# Altium PCB Copy of PCB1.PcbDoc (part 1 of 4)
Units mm, origin at the board's own origin, x right, y up, seen from the top; angles counter-clockwise.
Board outline 200 x 135 mm, 2 copper layers (Top Layer, Bottom Layer); 350 components, 150 nets, 843 pads, 244 vias.
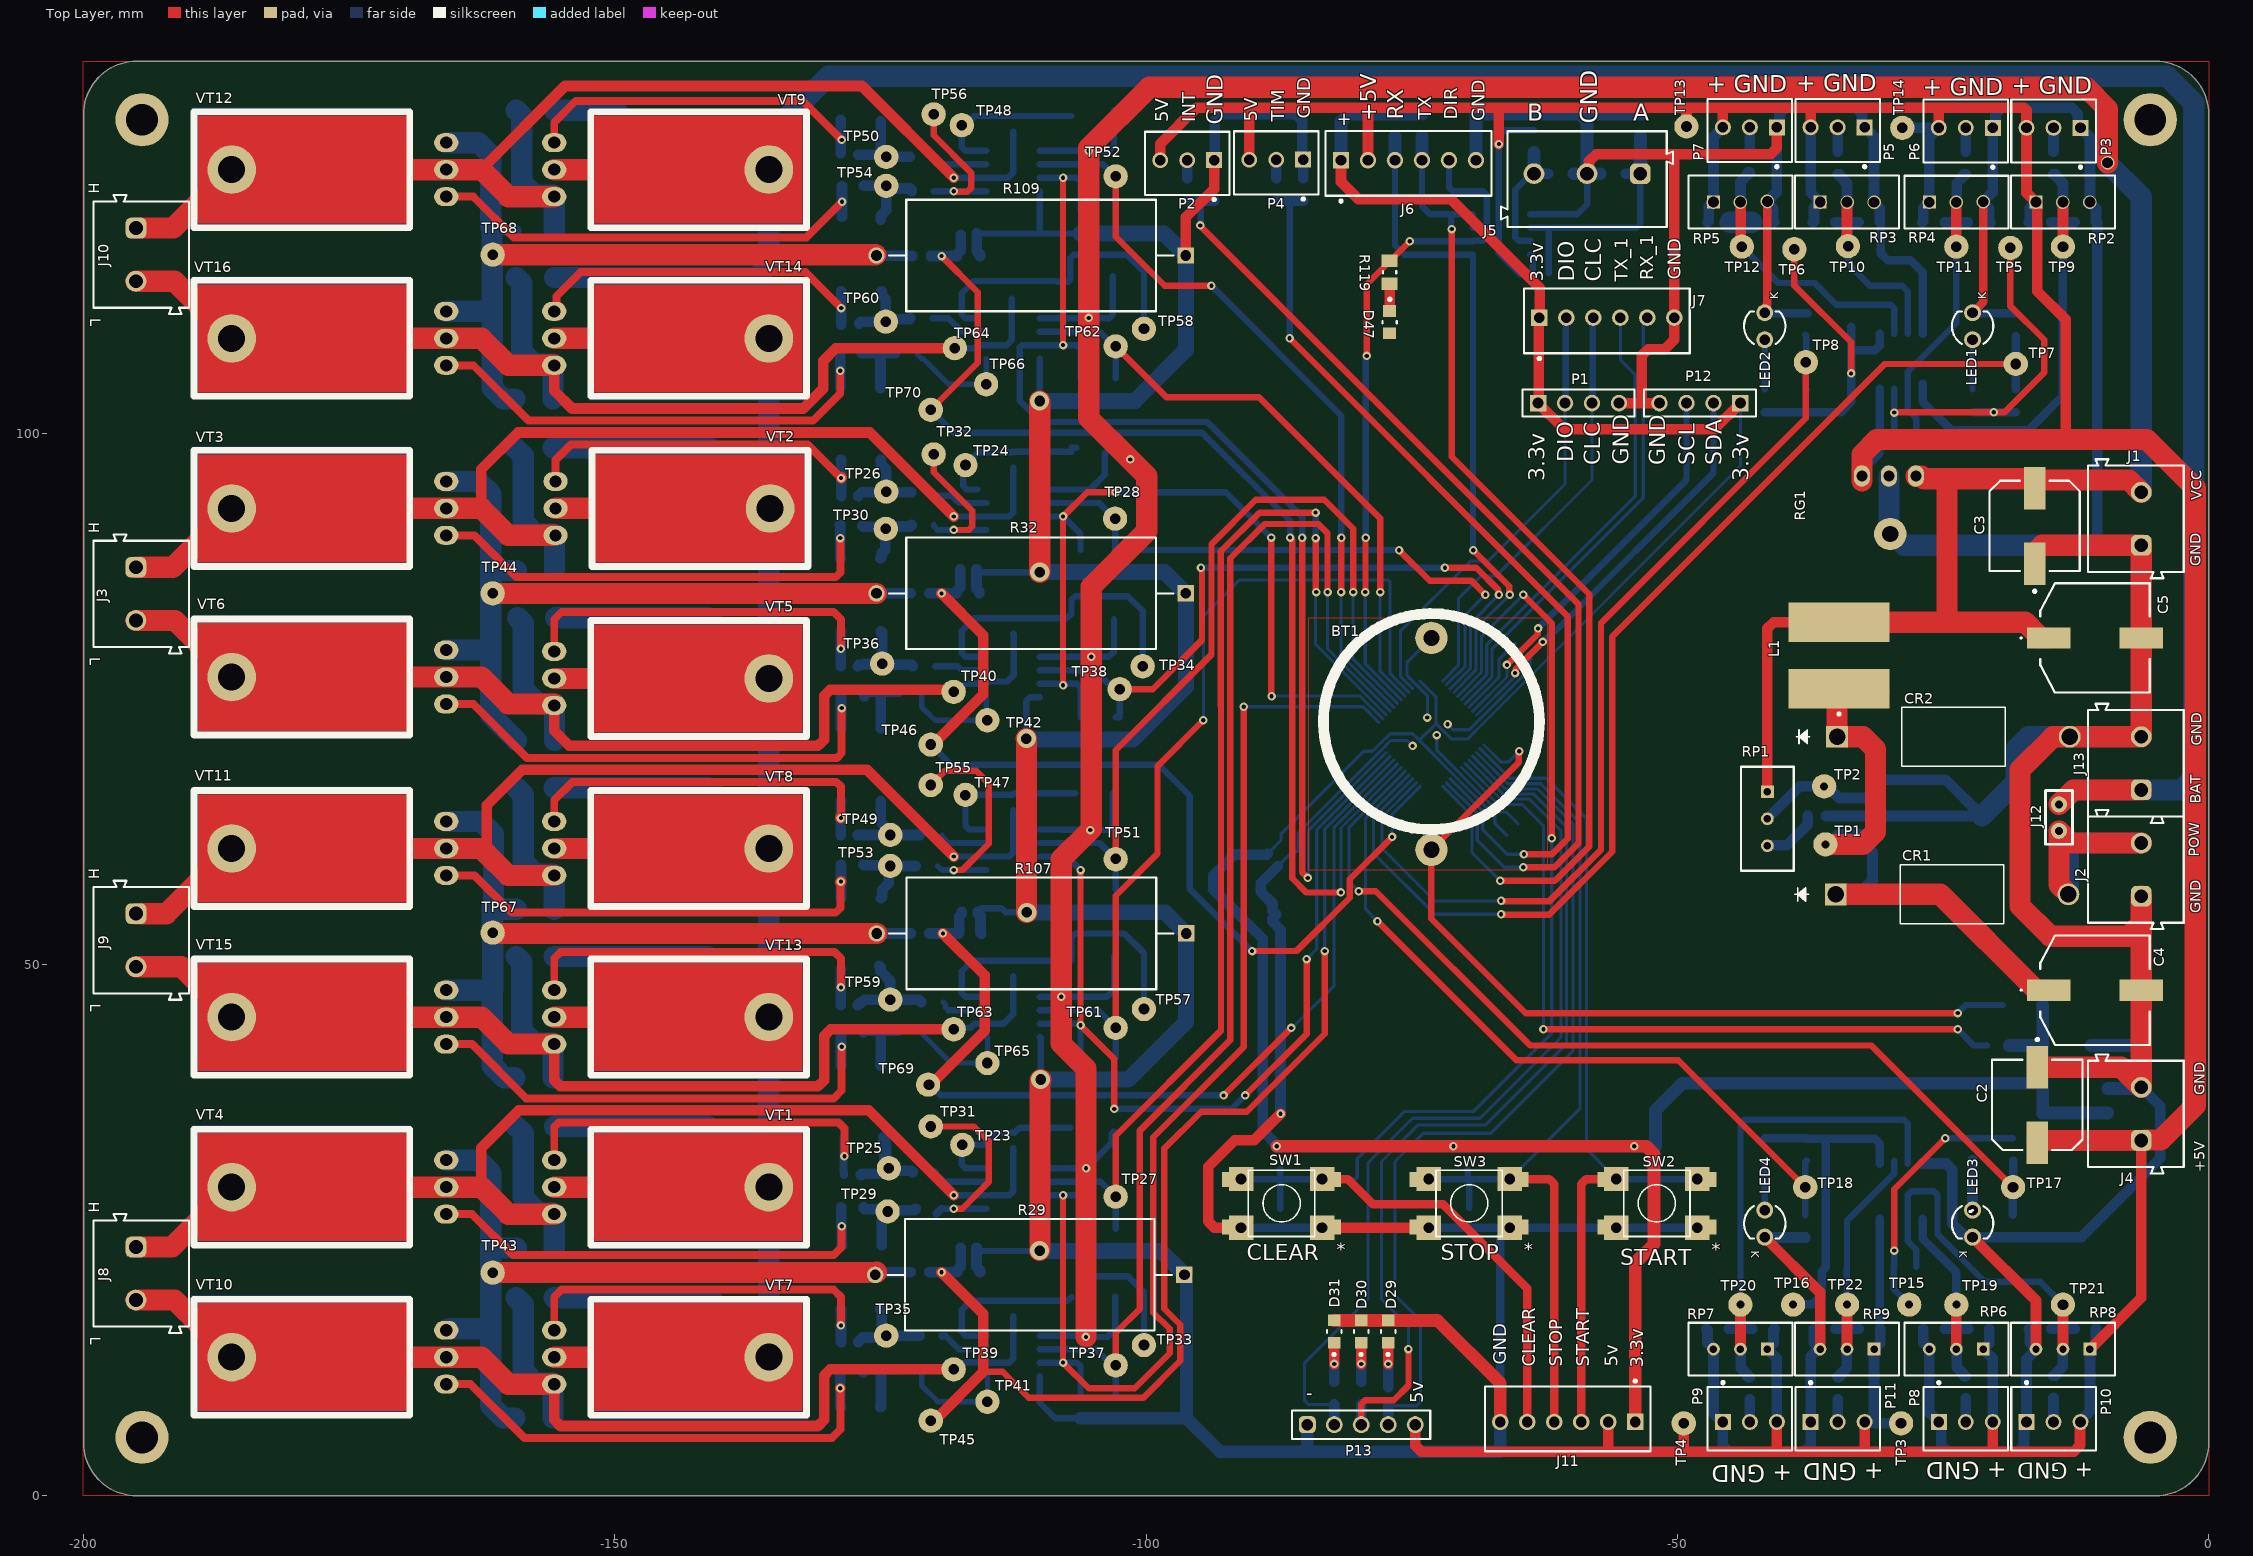
[diagram p0: Top Layer view]
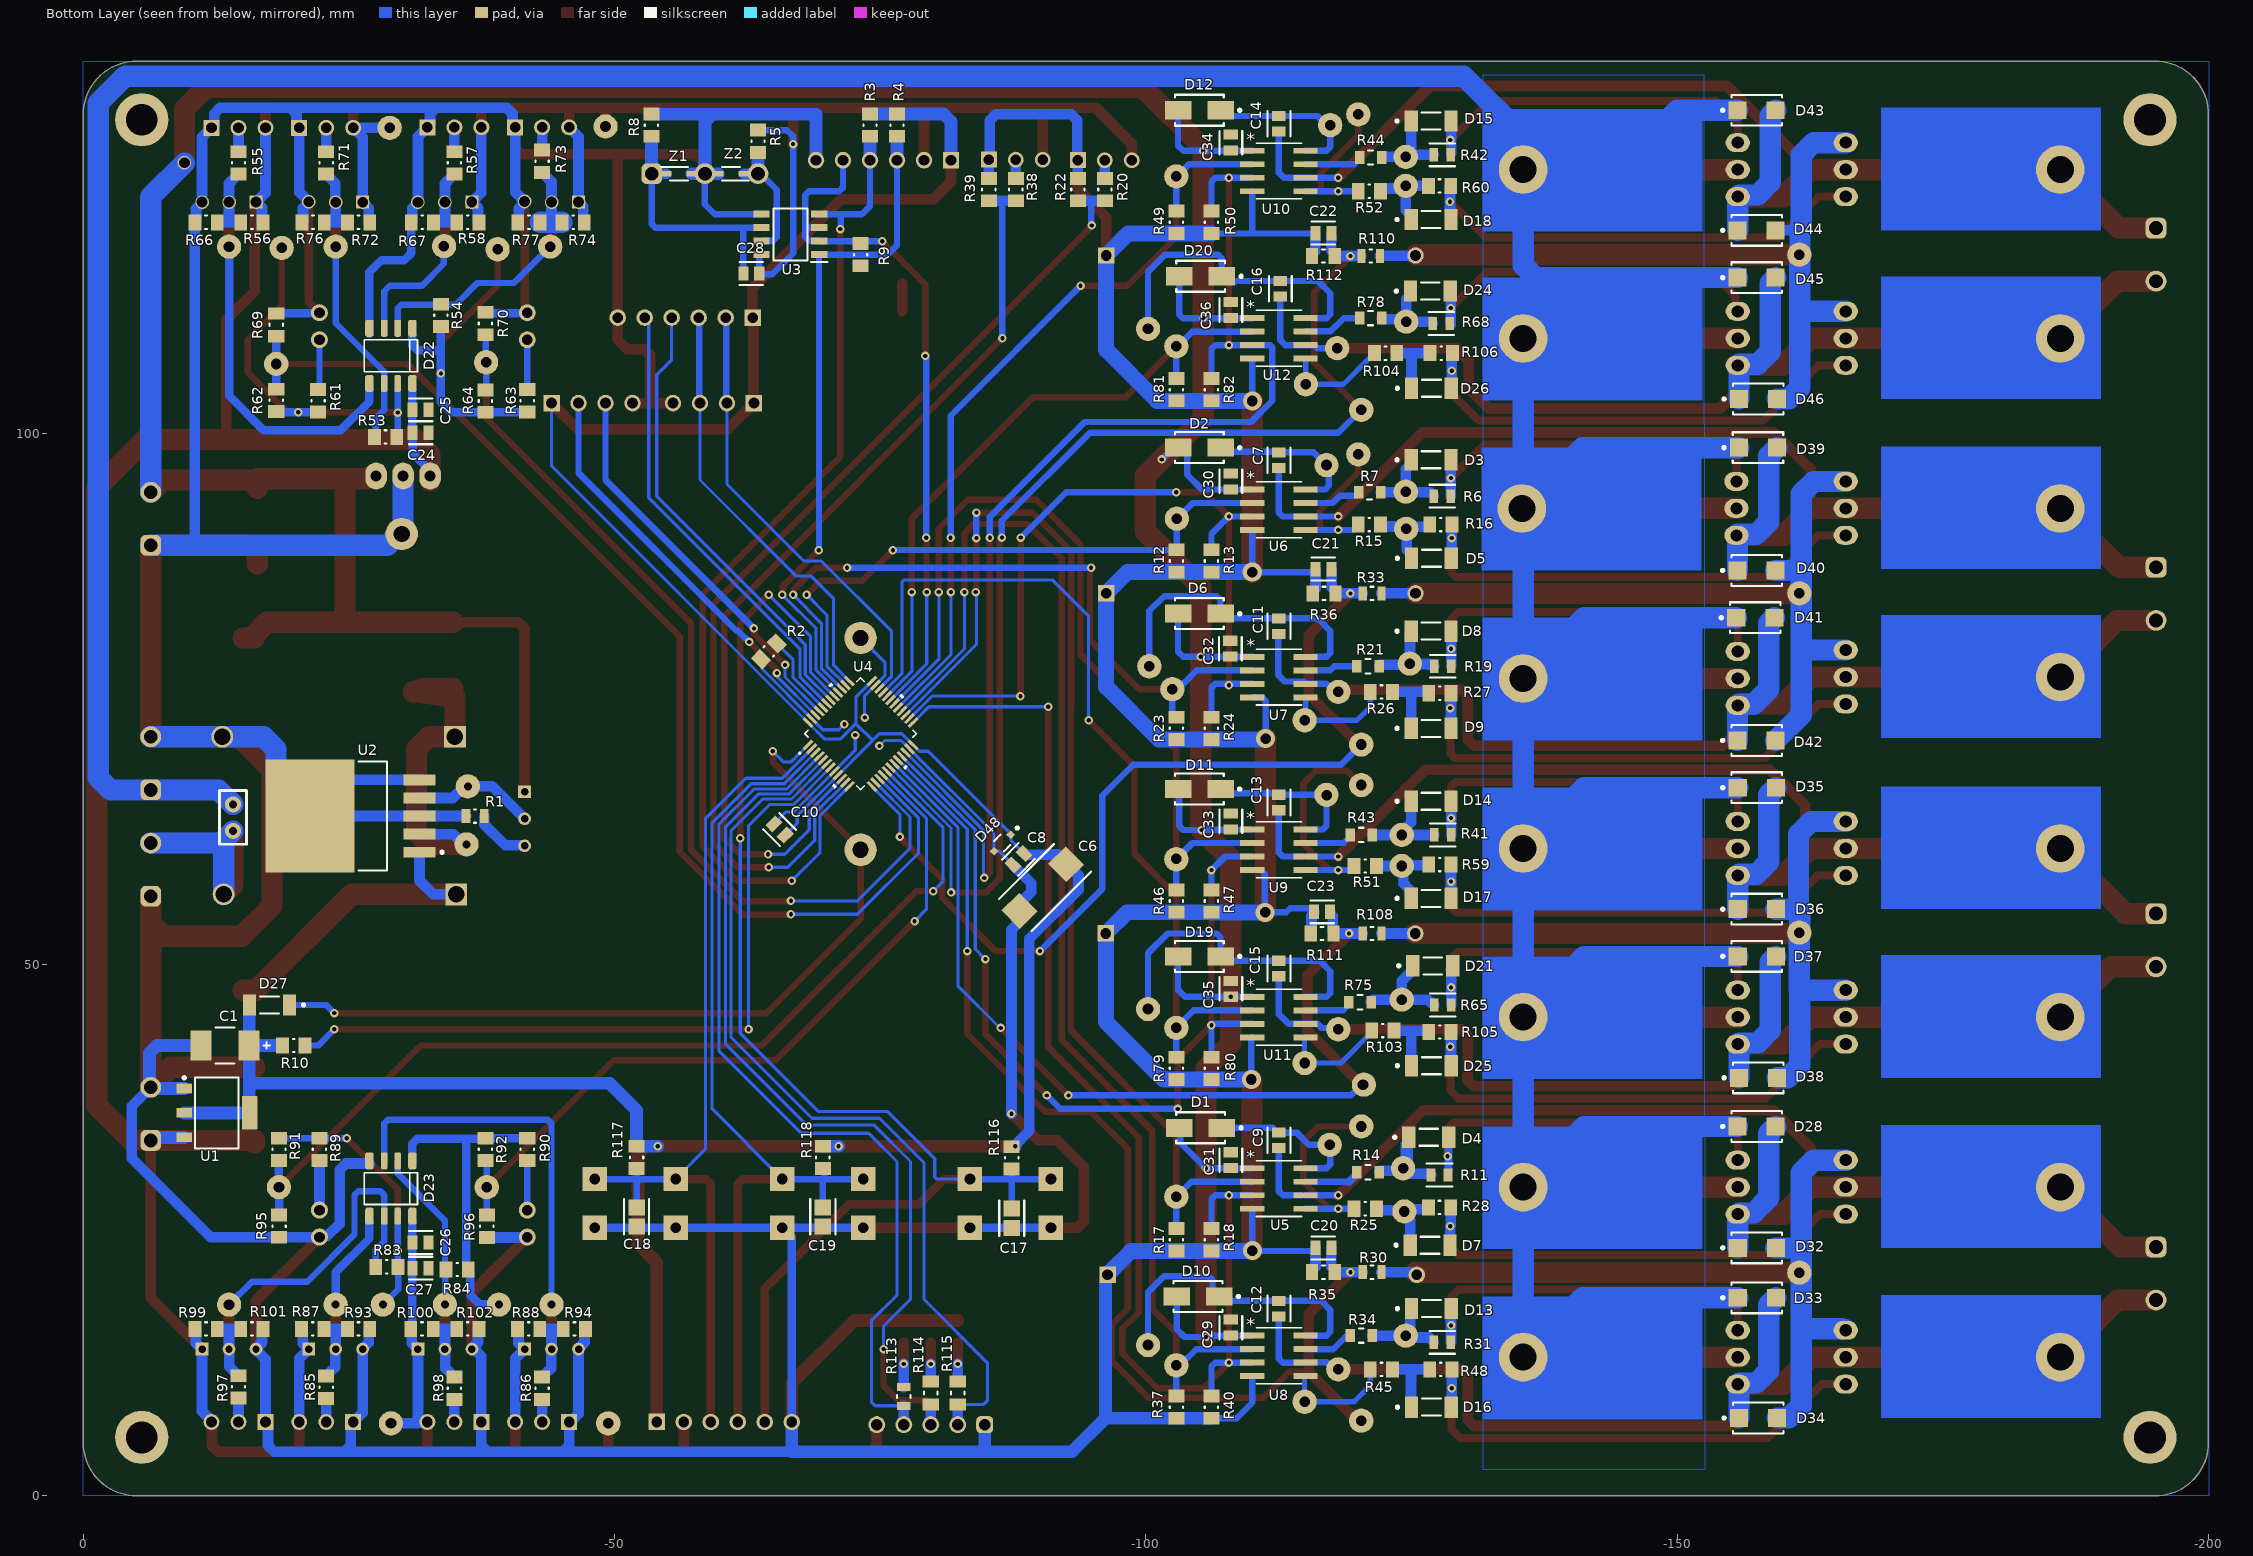
[diagram p1: Bottom Layer view, seen from below]

## Layer stack, top to bottom
Top Solder: solder mask 0.0102, Solder Resist, Dk 3.5
Top Layer: signal copper 0.0356
Dielectric 1: dielectric 0.32, FR-4, Dk 4.8
Bottom Layer: signal copper 0.0356
Bottom Solder: solder mask 0.0102, Solder Resist, Dk 3.5

## Board outline
-200,5 -200,130 cw(c-195,130) -195,135 -4.973,135 cw(c-5,130) 0,130 0,5 cw(c-5,5) -5,0 -4.975,0 -195,0 cw(c-195,5)

## Design rules (kind name [scope] priority, off if disabled: settings)
Clearance [All] p1: gap=0.1 ignorepadtopadclearanceinfootprint=TRUE
ComponentClearance [All] p1: gap=-2.254 collisioncheckmode=3 verticalgap=0.254 showdistances=FALSE
DiffPairsRouting [All] p1: maxlimit=0.254 minlimit=0.1 mostfreqgap=0.254 toplayer_minwidth=0.3 toplayer_maxwidth=2 toplayer_prefwidth=0.3 bottomlayer_minwidth=0.3 bottomlayer_maxwidth=2 bottomlayer_prefwidth=0.3 maxuncoupledlength=12.7
HoleToHoleClearance [All] p1: gap=0.2 allowstackedmicrovias=TRUE
LayerPairs [All] p1 off: enforce=TRUE
MinimumSolderMaskSliver [All] p1: minsoldermaskwidth=0.05
PasteMaskExpansion [All] p1: expansion=0.5
PlaneClearance [All] p1: clearance=0.2
PlaneConnect [All] p1: planeconnectstyle=Direct reliefexpansion=0.508 reliefentries=4 reliefconductorwidth=0.254 reliefairgap=0.254
PolygonConnect [All] p1: connectstyle=Direct reliefconductorwidth=0.254 reliefentries=4 polygonreliefangle="90 Angle" airgapwidth=0.254
RoutingVias [All] p1: holewidth=0.4 width=0.8 viastyle="Through Hole" minholewidth=0.254 minwidth=0.5 maxholewidth=0.75 maxwidth=1.5
ShortCircuit [All] p1: allowed=TRUE
SilkToSilkClearance [All] p1 off: silktosilkclearance=0.05
SolderMaskExpansion [All] p1: expansion=0.2 istentingtop=FALSE
UnRoutedNet [All] p1: checkbadconnections=TRUE
Width [All] p1: maxlimit=3 minlimit=0.254 preferedwidth=2
19 further rules are at their usual default settings.

## Components (designator, comment, footprint, x,y, rotation, side; value= is the part's Value field where it differs from the comment)
BT1 "CR2032_BAT" CR2032_BAT -73.152,72.858 r270 top locked
C1 "TAJC476M016RNJ" FP-TAJC-MFG -13.335,42.378 r180 bottom
C2 "EEE-1HA101UP" FP-SF-MFG -16.129,36.784 r270 top value=100uF
C3 "EEE-1HA101UP" FP-SF-MFG -16.383,91.273 r90 top value=100uF
C4 "EEE1HA101AP" EEEFK1V331P -10.7,47.585 r270 top
C5 "EEE1HA101AP" EEEFK1V331P -10.7,80.732 r270 top
C6 "293D106X9050E2TE3" CAPPM7343X430N -90.297,57.237 r315 bottom
C7 "GRM21BR61C106KE15L" FP-GRM21B-0_1-IPC_C -112.522,97.461 r270 bottom
C8 "C0805C224K5RACTU" FP-C0805C-DN-MFG -88.011,59.904 r315 bottom value="0.22 μF"
C9 "GRM21BR61C106KE15L" FP-GRM21B-0_1-IPC_C -112.522,33.453 r270 bottom
C10 "C0805C224K5RACTU" FP-C0805C-DN-MFG -65.532,62.698 r45 bottom value="0.22 μF"
C11 "GRM21BR61C106KE15L" FP-GRM21B-0_1-IPC_C -112.522,81.84 r270 bottom
C12 "GRM21BR61C106KE15L" FP-GRM21B-0_1-IPC_C -112.522,17.613 r270 bottom
C13 "GRM21BR61C106KE15L" FP-GRM21B-0_1-IPC_C -112.522,65.238 r270 bottom
C14 "GRM21BR61C106KE15L" FP-GRM21B-0_1-IPC_C -112.522,129.119 r270 bottom
C15 "GRM21BR61C106KE15L" FP-GRM21B-0_1-IPC_C -112.522,49.617 r270 bottom
C16 "GRM21BR61C106KE15L" FP-GRM21B-0_1-IPC_C -112.649,113.59 r270 bottom
C17 "C0805C224K5RACTU" FP-C0805C-DN-IPC_A -87.376,26.122 r90 bottom value="0.22 μF"
C18 "C0805C224K5RACTU" FP-C0805C-DN-IPC_A -52.07,26.249 r90 bottom value="0.22 μF"
C19 "C0805C224K5RACTU" FP-C0805C-DN-IPC_A -69.596,26.249 r90 bottom value="0.22 μF"
C20 "C0805C224K5RACTU" FP-C0805C-DN-MFG -116.713,23.328 r0 bottom value="0.22 μF"
C21 "C0805C224K5RACTU" FP-C0805C-DN-MFG -116.713,87.209 r0 bottom value="0.22 μF"
C22 "C0805C224K5RACTU" FP-C0805C-DN-MFG -116.713,118.832 r0 bottom value="0.22 μF"
C23 "C0805C224K5RACTU" FP-C0805C-DN-MFG -116.586,54.951 r0 bottom value="0.22 μF"
C24 "C0805C224K5RACTU" FP-C0805C-DN-MFG -31.75,100.036 r180 bottom value="0.22 μF"
C25 "C0805C224K5RACTU" FP-C0805C-DN-MFG -31.75,102.195 r180 bottom value="0.22 μF"
C26 "C0805C224K5RACTU" FP-C0805C-DN-MFG -31.75,23.836 r180 bottom value="0.22 μF"
C27 "C0805C224K5RACTU" FP-C0805C-DN-MFG -31.75,21.423 r180 bottom value="0.22 μF"
C28 "C0805C224K5RACTU" FP-C0805C-DN-MFG -62.865,115.022 r0 bottom value="0.22 μF"
C29 "C0805C224K5RACTU" FP-C0805C-DN-MFG -108,15.835 r90 bottom value="0.22 μF"
C30 "C0805C224K5RACTU" FP-C0805C-DN-MFG -108,95.464 r90 bottom value="0.22 μF"
C31 "C0805C224K5RACTU" FP-C0805C-DN-MFG -108,31.583 r90 bottom value="0.22 μF"
C32 "C0805C224K5RACTU" FP-C0805C-DN-MFG -107.95,79.716 r90 bottom value="0.22 μF"
C33 "C0805C224K5RACTU" FP-C0805C-DN-MFG -108,63.46 r90 bottom value="0.22 μF"
C34 "C0805C224K5RACTU" FP-C0805C-DN-MFG -108,127.341 r90 bottom value="0.22 μF"
C35 "C0805C224K5RACTU" FP-C0805C-DN-MFG -108,47.712 r90 bottom value="0.22 μF"
C36 "C0805C224K5RACTU" FP-C0805C-DN-MFG -108,111.593 r90 bottom value="0.22 μF"
CR1 "1N5822RL" DO-201AD_STM -35.103,56.602 r0 top
CR2 "1N5822RL" DO-201AD_STM -34.975,71.432 r0 top
D1 "US1G-13-F" FP-SMA-MFG -105.156,34.631 r0 bottom value=20pF
D2 "US1G-13-F" FP-SMA-MFG -105.029,98.639 r0 bottom value=20pF
D3 "LL4448-GS08" FP-6_560-5005_01-4-MFG -126.843,97.496 r180 bottom value=4pF
D4 "LL4448-GS08" FP-6_560-5005_01-4-MFG -126.619,33.742 r180 bottom value=4pF
D5 "LL4448-GS08" FP-6_560-5005_01-4-MFG -126.873,88.225 r180 bottom value=4pF
D6 "US1G-13-F" FP-SMA-MFG -105.029,83.018 r0 bottom value=20pF
D7 "LL4448-GS08" FP-6_560-5005_01-4-MFG -126.746,23.582 r180 bottom value=4pF
D8 "LL4448-GS08" FP-6_560-5005_01-4-MFG -126.843,81.367 r180 bottom value=4pF
D9 "LL4448-GS08" FP-6_560-5005_01-4-MFG -126.843,72.223 r180 bottom value=4pF
D10 "US1G-13-F" FP-SMA-MFG -104.902,18.756 r0 bottom value=20pF
D11 "US1G-13-F" FP-SMA-MFG -105.029,66.508 r0 bottom value=20pF
D12 "US1G-13-F" FP-SMA-MFG -105.029,130.389 r0 bottom value=20pF
D13 "LL4448-GS08" FP-6_560-5005_01-4-MFG -126.873,17.613 r180 bottom value=4pF
D14 "LL4448-GS08" FP-6_560-5005_01-4-MFG -126.843,65.365 r180 bottom value=4pF
D15 "LL4448-GS08" FP-6_560-5005_01-4-MFG -126.843,129.373 r180 bottom value=4pF
D16 "LL4448-GS08" FP-6_560-5005_01-4-MFG -126.873,8.342 r180 bottom value=4pF
D17 "LL4448-GS08" FP-6_560-5005_01-4-MFG -126.843,56.221 r180 bottom value=4pF
D18 "LL4448-GS08" FP-6_560-5005_01-4-MFG -126.843,120.102 r180 bottom value=4pF
D19 "US1G-13-F" FP-SMA-MFG -105.029,50.76 r0 bottom value=20pF
D20 "US1G-13-F" FP-SMA-MFG -105.156,114.768 r0 bottom value=20pF
D21 "LL4448-GS08" FP-6_560-5005_01-4-MFG -127,49.871 r180 bottom value=4pF
D22 "LMV358AIDR" 8-SOIC -28.956,107.275 r270 bottom
D23 "LMV358AIDR" 8-SOIC -28.956,28.916 r270 bottom
D24 "LL4448-GS08" FP-6_560-5005_01-4-MFG -126.776,113.371 r180 bottom value=4pF
D25 "LL4448-GS08" FP-6_560-5005_01-4-MFG -126.873,40.473 r180 bottom value=4pF
D26 "LL4448-GS08" FP-6_560-5005_01-4-MFG -126.873,104.227 r180 bottom value=4pF
D27 "LL4448-GS08" FP-6_560-5005_01-4-MFG -17.526,46.188 r0 bottom value=4pF
D28 "GF1M-E3/5CA" FP-GF1M-E3-5CA-MFG -157.48,34.758 r180 bottom
D29 "151031YS06000" Wurth_Electronics_0_MFG -77.216,15.454 r90 top
D30 "151031YS06000" LED_GREEN -79.756,15.454 r90 top
D31 "151031YS06000" LED_BLUE -82.296,15.454 r90 top
D32 "GF1M-E3/5CA" FP-GF1M-E3-5CA-MFG -157.492,23.328 r180 bottom
D33 "GF1M-E3/5CA" FP-GF1M-E3-5CA-MFG -157.492,18.629 r180 bottom
D34 "GF1M-E3/5CA" FP-GF1M-E3-5CA-MFG -157.619,7.326 r180 bottom
D35 "GF1M-E3/5CA" FP-GF1M-E3-5CA-MFG -157.492,66.635 r180 bottom
D36 "GF1M-E3/5CA" FP-GF1M-E3-5CA-MFG -157.492,55.205 r180 bottom
D37 "GF1M-E3/5CA" FP-GF1M-E3-5CA-MFG -157.492,50.76 r180 bottom
D38 "GF1M-E3/5CA" FP-GF1M-E3-5CA-MFG -157.619,39.33 r180 bottom
D39 "GF1M-E3/5CA" FP-GF1M-E3-5CA-MFG -157.607,98.639 r180 bottom
D40 "GF1M-E3/5CA" FP-GF1M-E3-5CA-MFG -157.48,87.082 r180 bottom
D41 "GF1M-E3/5CA" FP-GF1M-E3-5CA-MFG -157.353,82.637 r180 bottom
D42 "GF1M-E3/5CA" FP-GF1M-E3-5CA-MFG -157.48,71.08 r180 bottom
D43 "GF1M-E3/5CA" FP-GF1M-E3-5CA-MFG -157.48,130.389 r180 bottom
D44 "GF1M-E3/5CA" FP-GF1M-E3-5CA-MFG -157.48,119.086 r180 bottom
D45 "GF1M-E3/5CA" FP-GF1M-E3-5CA-MFG -157.48,114.641 r180 bottom
D46 "GF1M-E3/5CA" FP-GF1M-E3-5CA-MFG -157.619,103.211 r180 bottom
D47 "151031YS06000" LED_BLUE -77.089,110.45 r270 top
D48 "BZX384-C5V1,115" FP-SOD323-MFG -86.487,61.428 r315 bottom
J1 "691101710002" 691101710002 -6.85,91.948 r90 top
J2 "691101710002" 691101710002 -6.85,58.928 r90 top
J3 "691101710002" 691101710002 -194.572,84.883 r270 top
J4 "691101710002" 691101710002 -6.85,35.941 r90 top
J5 "691101710003" 691101710003 -58.5,123.92 r180 top
J6 "SWR25X-NRTC-S06-ST-BA" Sullins_SWR25X-NRTC-S06-ST-BA_MFG -75.311,125.39 r0 top
J7 "SWR25X-NRTC-S06-ST-BA" Sullins_SWR25X-NRTC-S06-ST-BA_MFG -56.642,110.577 r0 top
J8 "691101710002" 691101710002 -194.564,20.915 r270 top
J9 "691101710002" 691101710002 -194.564,52.284 r270 top
J10 "691101710002" 691101710002 -194.564,116.8 r270 top
J11 "SWR25X-NRTC-S06-ST-BA" Sullins_SWR25X-NRTC-S06-ST-BA_MFG -60.325,7.245 r180 top
J12 "Jumper 1x2.54" Jumper_2.54 -14.097,62.571 r90 top
J13 "691101710002" 691101710002 -6.85,68.932 r90 top
L1 "22µH, 2.04A" WE-PD2_1054 -34.798,79.081 r90 top
LED1 "151033BS03000" "Type 3mm" -22.225,110.069 r90 top
LED2 "151033BS03000" "Type 3mm" -41.783,110.064 r90 top
LED3 "151033BS03000" "Type 3mm" -22.225,25.614 r270 top
LED4 "151033BS03000" "Type 3mm" -41.783,25.614 r270 top
P1 "TSW-104-08-G-S" SMTC-TSW-104-08-X-S -63.119,102.83 r0 top
P2 "61900311121" 61900311121 -96.139,125.39 r0 top
P3 "61900311121" 61900311121 -14.605,128.438 r0 top
P4 "61900311121" 61900311121 -87.757,125.436 r0 top
P5 "61900311121" 61900311121 -34.925,128.484 r0 top
P6 "61900311121" 61900311121 -22.86,128.438 r0 top
P7 "61900311121" 61900311121 -43.18,128.484 r0 top
P8 "61900311121" 61900311121 -22.86,7.245 r180 top
P9 "61900311121" 61900311121 -43.18,7.245 r180 top
P10 "61900311121" 61900311121 -14.605,7.245 r180 top
P11 "61900311121" 61900311121 -34.925,7.245 r180 top
P12 "TSW-104-08-G-S" SMTC-TSW-104-08-X-S -44.069,102.83 r180 top
P13 "61300511121" 61300511121 -79.756,6.691 r0 top
R1 "1K" Vishay_CRCW0805-e3_IPC_C -36.868,63.968 r180 bottom
R2 "10K" Vishay_CRCW0805-e3_IPC_A -64.516,79.462 r315 bottom
R3 "10K" Vishay_CRCW0805-e3_IPC_A -74.041,128.992 r90 bottom
R4 "10K" Vishay_CRCW0805-e3_IPC_A -76.581,128.992 r90 bottom
R5 "10K" Vishay_CRCW0805-e3_IPC_A -63.5,127.468 r90 bottom
R6 "RT0805FRE0710RL" FP-RT0805-IPC_C -127.889,94.067 r180 bottom value=10Ω
R7 "RT0805FRE0710RL" FP-RT0805-MFG -121.065,94.448 r180 bottom value=10Ω
R8 "10K" Vishay_CRCW0805-e3_IPC_A -53.467,128.992 r270 bottom
R9 "10K" Vishay_CRCW0805-e3_IPC_A -73.152,116.8 r90 bottom
R10 "10K" Vishay_CRCW0805-e3_IPC_A -19.812,42.378 r0 bottom
R11 "RT0805FRE0710RL" FP-RT0805-IPC_C -127.635,30.186 r180 bottom value=10Ω
R12 "10k" Vishay_CRCW0805-e3_IPC_A -102.87,87.971 r90 bottom
R13 "CRCW080510K0FKEA" FP-CRCW0805-e3-IPC_A -106.172,87.971 r90 bottom
R14 "RT0805FRE0710RL" FP-RT0805-MFG -120.904,30.44 r180 bottom value=10Ω
R15 "10" Vishay_CRCW0805-e3_IPC_A -121.031,91.4 r0 bottom
R16 "10" Vishay_CRCW0805-e3_IPC_A -127.762,91.4 r0 bottom
R17 "10k" Vishay_CRCW0805-e3_IPC_A -102.87,24.09 r90 bottom
R18 "CRCW080510K0FKEA" FP-CRCW0805-e3-IPC_A -106.172,24.09 r90 bottom
R19 "RT0805FRE0710RL" FP-RT0805-IPC_C -127.929,78.065 r180 bottom value=10Ω
R20 "33K" Vishay_CRCW0805-e3_IPC_A -96.139,122.931 r90 bottom
R21 "RT0805FRE0710RL" FP-RT0805-MFG -120.904,78.065 r180 bottom value=10Ω
R22 "33K" Vishay_CRCW0805-e3_IPC_A -93.599,122.931 r90 bottom
R23 "10k" Vishay_CRCW0805-e3_IPC_A -102.87,72.223 r90 bottom
R24 "CRCW080510K0FKEA" FP-CRCW0805-e3-IPC_A -106.172,72.223 r90 bottom
R25 "10" Vishay_CRCW0805-e3_IPC_A -120.65,27.011 r0 bottom
R26 "10" Vishay_CRCW0805-e3_IPC_A -122.174,75.652 r0 bottom
R27 "10" Vishay_CRCW0805-e3_IPC_A -127.67,75.525 r0 bottom
R28 "10" Vishay_CRCW0805-e3_IPC_A -127.635,27.138 r0 bottom
R29 "SQP500JB-R91" FP-SQP500-MFG -110.948,20.788 r180 top value=1.2Ω
R30 "10K" Yageo_RC0805_IPC_C -121.285,21.042 r180 bottom
R31 "RT0805FRE0710RL" FP-RT0805-IPC_C -127.889,14.438 r180 bottom value=10Ω
R32 "SQP500JB-R91" FP-SQP500-MFG -110.821,84.923 r180 top value=1.2Ω
R33 "10K" Yageo_RC0805_IPC_C -121.285,84.923 r180 bottom
R34 "RT0805FRE0710RL" FP-RT0805-MFG -120.269,15.073 r180 bottom value=10Ω
R35 "1K" Yageo_RC0805_IPC_A -116.713,21.042 r180 bottom
R36 "1K" Yageo_RC0805_IPC_A -116.773,84.923 r180 bottom
R37 "10k" Vishay_CRCW0805-e3_IPC_A -102.87,8.342 r90 bottom
R38 "33K" Vishay_CRCW0805-e3_IPC_A -87.757,122.931 r90 bottom
R39 "10K" Vishay_CRCW0805-e3_IPC_A -85.217,122.931 r90 bottom
R40 "CRCW080510K0FKEA" FP-CRCW0805-e3-IPC_A -106.172,8.342 r90 bottom
R41 "RT0805FRE0710RL" FP-RT0805-IPC_C -127.929,62.19 r180 bottom value=10Ω
R42 "RT0805FRE0710RL" FP-RT0805-IPC_C -127.889,126.198 r180 bottom value=10Ω
R43 "RT0805FRE0710RL" FP-RT0805-MFG -120.269,62.19 r180 bottom value=10Ω
R44 "RT0805FRE0710RL" FP-RT0805-MFG -121.158,125.944 r180 bottom value=10Ω
R45 "10" Vishay_CRCW0805-e3_IPC_A -122.174,11.898 r0 bottom
R46 "10k" Vishay_CRCW0805-e3_IPC_A -102.87,55.967 r90 bottom
R47 "CRCW080510K0FKEA" FP-CRCW0805-e3-IPC_A -106.172,55.967 r90 bottom
R48 "10" Vishay_CRCW0805-e3_IPC_A -127.762,11.898 r0 bottom
R49 "10k" Vishay_CRCW0805-e3_IPC_A -102.87,119.848 r90 bottom
R50 "CRCW080510K0FKEA" FP-CRCW0805-e3-IPC_A -106.172,119.848 r90 bottom
R51 "10" Vishay_CRCW0805-e3_IPC_A -120.65,59.269 r0 bottom
R52 "10" Vishay_CRCW0805-e3_IPC_A -121.031,122.769 r0 bottom
R53 "100k" Vishay_CRCW0805-e3_IPC_A -28.448,99.655 r180 bottom
R54 "100k" Vishay_CRCW0805-e3_IPC_A -33.655,111.085 r270 bottom
R55 "47k" Vishay_CRCW0805-e3_IPC_A -14.605,125.436 r270 bottom
R56 "47k" Vishay_CRCW0805-e3_IPC_A -15.875,119.848 r180 bottom
R57 "47k" FP-CRCW0805-e3-IPC_A -34.925,125.436 r270 bottom
R58 "47k" Vishay_CRCW0805-e3_IPC_A -36.195,119.848 r180 bottom
R59 "10" Vishay_CRCW0805-e3_IPC_A -127.67,59.396 r0 bottom
R60 "10" Vishay_CRCW0805-e3_IPC_A -127.635,123.277 r0 bottom
R61 "220" Vishay_CRCW0805-e3_IPC_A -22.098,103.049 r270 bottom
R62 "10K" Vishay_CRCW0805-e3_IPC_A -18.161,103.084 r270 bottom
R63 "220" Vishay_CRCW0805-e3_IPC_A -41.783,103.049 r270 bottom
R64 "10K" Vishay_CRCW0805-e3_IPC_A -37.846,103.027 r270 bottom
R65 "RT0805FRE0710RL" FP-RT0805-IPC_C -127.929,46.188 r180 bottom value=10Ω
R66 "47k" Vishay_CRCW0805-e3_IPC_A -11.557,119.848 r180 bottom
R67 "47k" Vishay_CRCW0805-e3_IPC_A -31.912,119.848 r180 bottom
R68 "RT0805FRE0710RL" FP-RT0805-IPC_C -127.802,110.323 r180 bottom value=10Ω
R69 "2.2K" Yageo_RC0805_IPC_A -18.161,110.196 r270 bottom
R70 "2.2K" Vishay_CRCW0805-e3_IPC_A -37.846,110.323 r270 bottom
R71 "47k" Vishay_CRCW0805-e3_IPC_A -22.86,125.436 r270 bottom
R72 "47k" Vishay_CRCW0805-e3_IPC_A -25.908,119.848 r180 bottom
R73 "47k" Vishay_CRCW0805-e3_IPC_A -43.18,125.598 r270 bottom
R74 "47k" Vishay_CRCW0805-e3_IPC_A -46.101,119.848 r180 bottom
R75 "RT0805FRE0710RL" FP-RT0805-MFG -120.142,46.442 r180 bottom value=10Ω
R76 "47k" Vishay_CRCW0805-e3_IPC_A -21.625,119.848 r0 bottom
R77 "47k" Vishay_CRCW0805-e3_IPC_A -41.945,119.848 r0 bottom
R78 "RT0805FRE0710RL" FP-RT0805-MFG -121.158,110.831 r180 bottom value=10Ω
R79 "10k" Vishay_CRCW0805-e3_IPC_A -102.87,40.219 r90 bottom
R80 "CRCW080510K0FKEA" FP-CRCW0805-e3-IPC_A -106.172,40.219 r90 bottom
R81 "10k" Vishay_CRCW0805-e3_IPC_A -102.87,104.1 r90 bottom
R82 "CRCW080510K0FKEA" FP-CRCW0805-e3-IPC_A -106.172,104.1 r90 bottom
R83 "100k" Vishay_CRCW0805-e3_IPC_A -28.575,21.55 r180 bottom
R84 "100k" Vishay_CRCW0805-e3_IPC_A -35.179,21.296 r180 bottom
R85 "47k" Vishay_CRCW0805-e3_IPC_A -22.86,10.212 r90 bottom
R86 "47k" Vishay_CRCW0805-e3_IPC_A -43.18,10.12 r90 bottom
R87 "47k" Vishay_CRCW0805-e3_IPC_A -21.59,15.708 r0 bottom
R88 "47k" FP-CRCW0805-e3-IPC_A -41.91,15.708 r0 bottom
R89 "220" Vishay_CRCW0805-e3_IPC_A -22.225,32.599 r90 bottom
R90 "220" Vishay_CRCW0805-e3_IPC_A -41.783,32.599 r90 bottom
R91 "10K" Vishay_CRCW0805-e3_IPC_A -18.415,32.599 r90 bottom
R92 "10K" Vishay_CRCW0805-e3_IPC_A -37.846,32.599 r90 bottom
R93 "47k" Vishay_CRCW0805-e3_IPC_A -25.908,15.708 r0 bottom
R94 "47k" Vishay_CRCW0805-e3_IPC_A -46.228,15.708 r0 bottom
R95 "2.2K" Vishay_CRCW0805-e3_IPC_A -18.432,25.377 r90 bottom
R96 "2.2K" Vishay_CRCW0805-e3_IPC_A -37.973,25.36 r90 bottom
R97 "47k" Vishay_CRCW0805-e3_IPC_A -14.605,10.247 r90 bottom
R98 "CRCW080510K0FKEA" FP-CRCW0805-e3-IPC_A -34.925,10.12 r90 bottom
R99 "47k" Vishay_CRCW0805-e3_IPC_A -11.557,15.708 r0 bottom
R100 "47k" Vishay_CRCW0805-e3_IPC_A -31.877,15.708 r0 bottom
R101 "47k" Vishay_CRCW0805-e3_IPC_A -15.875,15.708 r180 bottom
R102 "47k" Vishay_CRCW0805-e3_IPC_A -36.195,15.708 r180 bottom
R103 "10" Vishay_CRCW0805-e3_IPC_A -122.301,43.775 r0 bottom
R104 "10" Vishay_CRCW0805-e3_IPC_A -122.555,107.529 r0 bottom
R105 "10" Vishay_CRCW0805-e3_IPC_A -127.67,43.648 r0 bottom
R106 "10" Vishay_CRCW0805-e3_IPC_A -127.797,107.529 r0 bottom
R107 "SQP500JB-R91" FP-SQP500-MFG -110.794,52.919 r180 top value=1.2Ω
R108 "10K" Yageo_RC0805_IPC_C -121.285,52.919 r180 bottom
R109 "SQP500JB-R91" FP-SQP500-MFG -110.821,116.723 r180 top value=1.2Ω
R110 "10K" Yageo_RC0805_IPC_C -121.158,116.673 r180 bottom
R111 "1K" Yageo_RC0805_IPC_A -116.586,52.919 r180 bottom
R112 "1K" Yageo_RC0805_IPC_A -116.713,116.673 r180 bottom
R113 "220" Yageo_RC0805_IPC_C -77.216,9.345 r270 bottom
R114 "220" Yageo_RC0805_IPC_A -79.756,9.672 r270 bottom
R115 "220" Yageo_RC0805_IPC_A -82.296,9.672 r270 bottom
R116 "10K" FP-CRCW0805-e3-IPC_A -87.376,31.802 r90 bottom
R117 "10K" FP-CRCW0805-e3-IPC_A -52.07,31.837 r90 bottom
R118 "10K" FP-CRCW0805-e3-IPC_A -69.596,31.837 r90 bottom
R119 "220" Yageo_RC0805_IPC_A -77.089,115.149 r90 top
RG1 "Reg_Fairchild_LM7805CT_eec" TO-220(bend_rad) -29.718,85.812 r180 top
RP1 "50k" Bourns_3296W_MFG -41.529,63.714 r180 top
RP2 "10k" Bourns_3296W_MFG -13.716,121.758 r270 top
RP3 "10k" Bourns_3296W_MFG -34.036,121.758 r270 top
RP4 "10k" Bourns_3296W_MFG -23.749,121.753 r270 top
RP5 "10k" Bourns_3296W_MFG -44.069,121.758 r270 top
RP6 "10k" Bourns_3296W_MFG -23.749,13.798 r90 top
RP7 "10k" Bourns_3296W_MFG -44.069,13.798 r90 top
RP8 "10k" Bourns_3296W_MFG -13.716,13.798 r90 top
RP9 "10k" Bourns_3296W_MFG -34.036,13.798 r90 top
SW1 "4-1437565-2" SW4_FSM-5P23_TEC -87.249,27.519 r180 top
SW2 "4-1437565-2" SW4_FSM-5P23_TEC -51.943,27.519 r180 top
SW3 "4-1437565-2" SW4_FSM-5P23_TEC -69.596,27.519 r180 top
TP1 "Test_Point_PCB" Test_Point#1 -36.068,61.301 r180 top
TP2 "Test_Point_PCB" Test_Point#1 -36.195,66.762 r180 top
TP3 "Test_Point_PCB" Test_Point#1 -28.956,6.818 r0 top
TP4 "Test_Point_PCB" Test_Point#1 -49.403,6.818 r0 top
TP5 "Test_Point_PCB" Test_Point#1 -18.669,117.435 r0 top
TP6 "Test_Point_PCB" Test_Point#1 -38.989,117.308 r0 top
TP7 "Test_Point_PCB" Test_Point#1 -18.161,106.513 r0 top
TP8 "Test_Point_PCB" Test_Point#1 -37.91,106.675 r90 top
TP9 "Test_Point_PCB" Test_Point#2 -13.716,117.562 r0 top
TP10 "Test_Point_PCB" Test_Point#1 -33.953,117.606 r90 top
TP11 "Test_Point_PCB" Test_Point#1 -23.749,117.562 r90 top
TP12 "Test_Point_PCB" Test_Point#1 -43.942,117.562 r90 top
TP13 "Test_Point_PCB" Test_Point#1 -49.149,128.865 r90 top
TP14 "Test_Point_PCB" Test_Point#1 -28.829,128.738 r90 top
TP15 "Test_Point_PCB" Test_Point#1 -28.194,17.994 r90 top
TP16 "Test_Point_PCB" Test_Point#1 -39.116,17.994 r90 top
TP17 "Test_Point_PCB" Test_Point#1 -18.415,29.043 r180 top
TP18 "Test_Point_PCB" Test_Point#1 -37.973,29.043 r90 top
TP19 "Test_Point_PCB" Test_Point#1 -23.749,17.994 r90 top
TP20 "Test_Point_PCB" Test_Point#1 -44.069,17.994 r90 top
TP21 "Test_Point_PCB" Test_Point#1 -13.716,17.994 r90 top
TP22 "Test_Point_PCB" Test_Point#1 -34.036,17.994 r90 top
TP23 "Test_Point_PCB" Test_Point#1 -117.3,33.025 r0 top
TP24 "Test_Point_PCB" Test_Point#3 -117.348,97.115 r0 top
TP25 "Test_Point_PCB" Test_Point#1 -124.206,30.821 r90 top
TP26 "Test_Point_PCB" Test_Point#4 -124.46,94.448 r90 top
TP27 "Test_Point_PCB" Test_Point#1 -102.87,28.154 r90 top
TP28 "Test_Point_PCB" Test_Point#5 -103.793,91.991 r90 top
TP29 "Test_Point_PCB" Test_Point#1 -124.333,26.757 r90 top
TP30 "Test_Point_PCB" Test_Point#6 -124.418,91.291 r90 top
TP31 "Test_Point_PCB" Test_Point#1 -120.269,34.758 r90 top
TP32 "Test_Point_PCB" Test_Point#7 -120.269,98.385 r90 top
TP33 "Test_Point_PCB" Test_Point#1 -100.203,14.184 r0 top
TP34 "Test_Point_PCB" Test_Point#1 -100.33,78.065 r0 top
TP35 "Test_Point_PCB" Test_Point#1 -124.46,15.073 r90 top
TP36 "Test_Point_PCB" Test_Point#1 -124.841,78.319 r270 top
TP37 "Test_Point_PCB" Test_Point#1 -102.87,12.279 r90 top
TP38 "Test_Point_PCB" Test_Point#1 -102.489,75.906 r90 top
TP39 "Test_Point_PCB" Test_Point#1 -118.11,11.898 r90 top
TP40 "Test_Point_PCB" Test_Point#1 -118.11,75.652 r90 top
TP41 "Test_Point_PCB" Test_Point#1 -114.935,8.85 r90 top
TP42 "Test_Point_PCB" Test_Point#1 -114.935,72.985 r270 top
TP43 "Test_Point_PCB" Test_Point#8 -161.544,21.042 r90 top
TP44 "Test_Point_PCB" Test_Point#9 -161.544,84.923 r90 top
TP45 "Test_Point_PCB" Test_Point#1 -120.269,7.072 r90 top
TP46 "Test_Point_PCB" Test_Point#1 -120.269,70.699 r90 top
TP47 "Test_Point_PCB" Test_Point#1 -116.997,65.965 r90 top
TP48 "Test_Point_PCB" Test_Point#10 -117.348,128.992 r90 top
TP49 "Test_Point_PCB" Test_Point#1 -124.079,62.19 r180 top
TP50 "Test_Point_PCB" Test_Point#11 -124.46,126.325 r90 top
TP51 "Test_Point_PCB" Test_Point#1 -102.87,59.904 r90 top
TP52 "Test_Point_PCB" Test_Point#1 -102.87,124.166 r90 top
TP53 "Test_Point_PCB" Test_Point#1 -124.079,59.269 r90 top
TP54 "Test_Point_PCB" Test_Point#1 -124.46,123.277 r90 top
TP55 "Test_Point_PCB" Test_Point#1 -120.269,66.889 r90 top
TP56 "Test_Point_PCB" Test_Point#12 -120.269,130.008 r90 top
TP57 "Test_Point_PCB" Test_Point#1 -100.203,45.807 r90 top
TP58 "Test_Point_PCB" Test_Point#1 -100.203,109.815 r0 top
TP59 "Test_Point_PCB" Test_Point#1 -124.079,46.696 r90 top
TP60 "Test_Point_PCB" Test_Point#13 -124.587,110.831 r90 top
TP61 "Test_Point_PCB" Test_Point#1 -102.87,44.029 r90 top
TP62 "Test_Point_PCB" Test_Point#1 -102.87,108.164 r90 top
TP63 "Test_Point_PCB" Test_Point#1 -118.11,43.902 r90 top
TP64 "Test_Point_PCB" Test_Point#14 -118.364,107.656 r90 top
TP65 "Test_Point_PCB" Test_Point#1 -114.935,40.727 r0 top
TP66 "Test_Point_PCB" Test_Point#1 -115.062,104.608 r90 top
TP67 "Test_Point_PCB" Test_Point#15 -161.544,52.919 r90 top
TP68 "Test_Point_PCB" Test_Point#9 -161.544,116.8 r90 top
TP69 "Test_Point_PCB" Test_Point#1 -120.523,38.695 r90 top
TP70 "Test_Point_PCB" Test_Point#1 -120.269,102.195 r90 top
U1 "LM1117MPX-3.3/NOPB" DCY0004A_L -12.573,36.028 r180 bottom
U2 "LM2576" ON_Semiconductor_936A-02_MFG -25.156,63.968 r90 bottom
U3 "MAX485ECSA+" SOIC127P600X175-8N -66.548,118.705 r0 bottom
U4 "STM32F303CCT6" LQFP48-7x7mm -73.152,71.715 r135 bottom locked
U5 "IR2104SPBF" SOIC8_INF-M -112.522,28.916 r180 bottom
U6 "IR2104SPBF" SOIC8_INF-M -112.522,92.797 r180 bottom
U7 "IR2104SPBF" SOIC8_INF-M -112.522,77.049 r180 bottom
U8 "IR2104SPBF" SOIC8_INF-M -112.522,13.168 r180 bottom
U9 "IR2104SPBF" SOIC8_INF-M -112.522,60.793 r180 bottom
U10 "IR2104SPBF" SOIC8_INF-M -112.522,124.674 r180 bottom
U11 "IR2104SPBF" SOIC8_INF-M -112.522,45.045 r180 bottom
U12 "IR2104SPBF" SOIC8_INF-M -112.522,108.926 r180 bottom
VT1 "IRF3205" TO-220(bend2) -144.526,29.297 r270 top
VT2 "IRF3205" TO-220(bend2) -144.399,93.178 r270 top
VT3 "IRF3205" TO-220(bend2) -177.038,92.67 r90 top
VT4 "IRF3205" TO-220(bend2) -177.038,28.789 r90 top
VT5 "IRF3205" TO-220(bend2) -144.526,77.176 r270 top
VT6 "IRF3205" TO-220(bend2) -177.038,76.795 r90 top
VT7 "IRF3205" TO-220(bend2) -144.526,13.295 r270 top
VT8 "IRF3205" TO-220(bend2) -144.526,61.174 r270 top
VT9 "IRF3205" TO-220(bend2) -144.526,125.055 r270 top
VT10 "IRF3205" TO-220(bend2) -177.038,12.787 r90 top
VT11 "IRF3205" TO-220(bend2) -177.038,60.666 r90 top
VT12 "IRF3205" TO-220(bend2) -177.038,124.547 r90 top
VT13 "IRF3205" TO-220(bend2) -144.526,45.299 r270 top
VT14 "IRF3205" TO-220(bend2) -144.526,109.18 r270 top
VT15 "IRF3205" TO-220(bend2) -177.038,44.791 r90 top
VT16 "IRF3205" TO-220(bend2) -177.038,108.672 r90 top
Z1 "MM3Z5V1ST1G" SOD2512X110N -56.064,124.42 r180 bottom
Z2 "MM3Z5V1ST1G" SOD2512X110N -60.96,124.42 r0 bottom

## Footprints (in the part's own frame and the unit in brackets; to place one, negate y for a bottom-side part, rotate by r counter-clockwise, add the part's x,y. Pads: shape width x height; smd on the part's side, far side on the other; paste and mask are expansions set on the pad)
8-SOIC [mm] "SOIC, 8-Leads, Body 4,90x3,90mm, Pitch 1,27mm, IPC Medium Density"
  rrect50% 1.6x0.8 smd: 1(-2.6,2.025) 4(-2.6,-2.025) 5(2.6,-2.025) 8(2.6,2.025)
  rrect50% 1.6x0.6 smd: 2(-2.6,0.635) 3(-2.6,-0.635) 6(2.6,-0.635) 7(2.6,0.635)
  silkscreen extent -1.5,-2.5 1.5,2.5, body extent -3,-2.45 3,2.45, height 1.75
61300511121 [mm] "Pin Header, pitch 2.54 mm, THT, Vertical, single row, 5p"
  rrect50% 1.6x1.6 hole 1.1: 1(-5.08,0)
  round 1.6 hole 1.1: 2(-2.54,0) 3(0,0) 4(2.54,0) 5(5.08,0)
  silkscreen extent -6.5,-1.35 6.5,1.35, body extent -6.35,-1.27 6.35,1.27, height 8.57
61900311121 [mm] "2.54mm Male Locking Header, 3p"
  rect 1.5x1.5 hole 1: 1(2.54,0.3)
  round 1.5 hole 1: 2(0,0.3) 3(-2.54,0.3)
  silkscreen extent -3.98,-3.52 3.98,2.98, body extent -3.81,-2.9 3.81,2.9, height 11.53
691101710002 [mm] "5,00mm - modular - blue - Horizontal entry with pressure clamp - 12,6mm height - 02p"
  rrect50% 1.95x1.95 hole 1.3: 1(-2.5,-0.5)
  round 1.95 hole 1.3: 2(2.5,-0.5)
  silkscreen extent -5.6,-4.5 5.6,4.5, body extent -5.6,-4.5 5.6,4.5, height 12.65
691101710003 [mm] "5,00mm - modular - blue - Horizontal entry with pressure clamp - 12,6mm height - 03p"
  rrect50% 1.95x1.95 hole 1.3: 1(-5,-0.5)
  round 1.95 hole 1.3: 2(0,-0.5) 3(5,-0.5)
  silkscreen extent -8.1,-4.5 8.1,4.5, body extent -8.1,-4.5 8.1,4.5, height 12.65
Bourns_3296W_MFG [mm]
  rect 1.2x1.2 hole 0.7 paste-1000 mask+0: 1(0.005,-2.54)
  round 1.2 hole 0.7 paste-1000 mask+0: 2(0.005,0) 3(0.005,2.54)
  silkscreen extent -2.48,-4.89 2.48,4.89, body extent -2.58,-4.99 2.58,4.99, height 0.25
CAPPM7343X430N [mm]
  rect 2.35x2.45 smd: 1(-3.1,0) 2(3.1,0)
  silkscreen extent -4.27,-2.15 3.65,2.15, body extent -3.59,-2.35 3.6,2.35, height 4.12
CR2032_BAT [mil]
  round 120 hole 60: 1(-310,0) 2(475,0)
  silkscreen extent -400,-400 400,400, body extent -432,-435 525,439, height 350
DCY0004A_L [mm] "SOT223, 4-Leads, Body 6.7x3.7mm, Pitch 2.3mm, IPC High Density"
  rrect11% 1.45x0.9 smd: 1(-3.075,2.3) 2(-3.075,0) 3(-3.075,-2.3)
  rrect7% 1.45x3.15 smd: 4(3.075,0)
  silkscreen extent -3.2,-3.35 2.05,3.42, body extent -3.5,-3.25 3.5,3.25, height 1.62
DO-201AD_STM [mil]
  rect 81x81 hole 61 mask+0: 1(0,0)
  round 81 hole 61 mask+0: 2(862,0)
  silkscreen extent -151,-110 623,110, body extent -26,-105 887,105, height 209
EEEFK1V331P [mm]
  rect 2x4.1 smd: 1(0,-4.35) 2(0,4.35)
  silkscreen extent -5.15,-7 5.15,5.15, body extent -5.15,-5.85 5.15,5.85, height 10.3
FP-6_560-5005_01-4-MFG [mm]
  rect 1.25x2 smd paste+0 mask+0: 1(-1.875,0) 2(1.875,0)
  silkscreen extent -3.33,-0.8 0.87,0.8, body extent -1.75,-0.8 1.75,0.8, height 1.6
FP-C0805C-DN-IPC_A [mm]
  rect 1.505x1.556 smd paste+0 mask+0: 1(-0.901,0) 2(0.901,0)
  silkscreen extent -1.65,-1.18 1.65,1.18, body extent -1,-0.63 1,0.63, height 0.88
FP-C0805C-DN-MFG [mm]
  rect 0.95x1.35 smd paste+0 mask+0: 1(-0.75,0) 2(0.75,0)
  silkscreen extent -1.1,-1.07 1.1,1.07, body extent -1,-0.62 1,0.62, height 0.88
FP-CRCW0805-e3-IPC_A [mil]
  rect 47.5x59.38 smd paste+0 mask+0: 1(-41.37,0) 2(41.37,0)
  silkscreen extent -3,-25 3,25, body extent -39,-25 39,25, height 20
FP-GF1M-E3-5CA-MFG [mm]
  rect 1.7x1.68 smd paste+0 mask+0: 1(-1.79,0) 2(1.79,0)
  silkscreen extent -3.33,-1.45 2.37,1.45, body extent -2.67,-1.32 2.67,1.32, height 3
FP-GRM21B-0_1-IPC_C [mm]
  rect 0.958x1.262 smd paste+0 mask+0: 1(-0.727,0) 2(0.727,0)
  silkscreen extent -1.21,-1.07 1.21,1.07, body extent -1,-0.63 1,0.63, height 1.35
FP-RT0805-IPC_C [mm]
  rect 0.808x1.262 smd paste+0 mask+0: 1(-0.802,0) 2(0.802,0)
  silkscreen extent -1.21,-1.07 1.21,1.07, body extent -1,-0.63 1,0.63, height 0.6
FP-RT0805-MFG [mm]
  rect 0.9x1.2 smd paste+0 mask+0: 1(-1.05,0) 2(1.05,0)
  silkscreen extent -0.23,-0.67 0.23,0.67, body extent -1,-0.63 1,0.63, height 0.6
FP-SF-MFG [mm]
  rect 4x2 smd paste+0 mask+0: 1(-3.55,0) 2(3.55,0)
  silkscreen extent -6.27,-4.25 4.25,4.25, body extent -5.8,-4.5 5.8,4.5, height 0.25
FP-SMA-MFG [mm]
  rect 2.5x1.7 smd paste+0 mask+0: 1(-2,0) 2(2,0)
  silkscreen extent -3.92,-1.46 2.3,1.46, body extent -2.6,-1.3 2.6,1.3, height 2.4
FP-SOD323-MFG [mm]
  rect 0.6x0.6 smd paste-1000 mask+0: 1(-1.1,0) 2(1.1,0)
  silkscreen extent -2.12,-0.67 0.42,0.67, body extent -1.25,-0.62 1.25,0.62, height 1.1
FP-SQP500-MFG [mm]
  rect 1.55x1.55 hole 1 paste-1000 mask+0: 1(-14.555,0)
  round 1.55 hole 1 paste-1000 mask+0: 2(14.555,0)
  silkscreen extent -13.38,-5.25 13.38,5.25, body extent -15.43,-5.35 15.43,5.35, height 0.25
FP-TAJC-MFG [mm]
  rect 2x2.8 smd paste+0 mask+0: 1(-2.25,0) 2(2.25,0)
  silkscreen extent -0.87,-1.7 4.23,1.7, body extent -3,-1.6 3,1.6, height 2.8
Jumper_2.54 [mil]
  round 60 hole 30: 1(0,0) 2(98.43,0)
  silkscreen extent -50,-50 150,50
LED_BLUE [mm]
  rect 1.1x1.2 smd paste+0 mask+0: 1(-1.05,0) 2(1.05,0)
  silkscreen extent -2.27,-0.67 0.13,0.67, body extent -1,-0.63 1,0.63, height 0.8
LED_GREEN [mm]
  rect 1.1x1.2 smd paste+0 mask+0: 1(-1.05,0) 2(1.05,0)
  silkscreen extent -2.27,-0.67 0.13,0.67, body extent -1,-0.63 1,0.63, height 0.8
LQFP48-7x7mm [mm]
  rect 1.194x0.305 smd paste+0 mask+0: 1(-4.25,2.75) 2(-4.25,2.25) 3(-4.25,1.75) 4(-4.25,1.25) 5(-4.25,0.75) 6(-4.25,0.25) 7(-4.25,-0.25) 8(-4.25,-0.75) 9(-4.25,-1.25) 10(-4.25,-1.75) 11(-4.25,-2.25) 12(-4.25,-2.75) 25(4.25,-2.75) 26(4.25,-2.25) 27(4.25,-1.75) 28(4.25,-1.25) 29(4.25,-0.75) 30(4.25,-0.25) 31(4.25,0.25) 32(4.25,0.75) 33(4.25,1.25) 34(4.25,1.75) 35(4.25,2.25) 36(4.25,2.75)
  rect 0.305x1.194 smd paste+0 mask+0: 13(-2.75,-4.25) 14(-2.25,-4.25) 15(-1.75,-4.25) 16(-1.25,-4.25) 17(-0.75,-4.25) 18(-0.25,-4.25) 19(0.25,-4.25) 20(0.75,-4.25) 21(1.25,-4.25) 22(1.75,-4.25) 23(2.25,-4.25) 24(2.75,-4.25) 37(2.75,4.25) 38(2.25,4.25) 39(1.75,4.25) 40(1.25,4.25) 41(0.75,4.25) 42(0.25,4.25) 43(-0.25,4.25) 44(-0.75,4.25) 45(-1.25,4.25) 46(-1.75,4.25) 47(-2.25,4.25) 48(-2.75,4.25)
  silkscreen extent -5.43,-5.35 5.35,5.35, body extent -4.5,-4.5 4.5,4.5, height 1.6
ON_Semiconductor_936A-02_MFG [mm]
  rect 1.016x3.05 smd paste+0 mask+0: 1(-3.404,-6.485) 2(-1.702,-6.485) 3(0,-6.485) 4(1.702,-6.485) 5(3.404,-6.485)
  rect 10.66x8.38 smd paste+0 mask+0: 6(0,3.82)
  silkscreen extent -5.12,-8.72 5.12,-0.75, body extent -5.01,-7.11 5.01,7.14, height 4.83
SMTC-TSW-104-08-X-S [mm] ".025 SQ Post Terminal Strip Assembly, 1x4 Pins, Vertical, 2.54mm Pitch, Male"
  rect 1.55x1.55 hole 1.02: 1(0,0)
  round 1.55 hole 1.02: 2(2.54,0) 3(5.08,0) 4(7.62,0)
  silkscreen extent -1.46,-1.27 9.08,1.27, body extent -1.27,-1.27 8.89,1.27, height 8.38
SOD2512X110N [mm]
  rect 1x0.5 smd: 1(-1.2,0) 2(1.2,0)
  silkscreen extent -1.7,-0.63 0.85,0.63, body extent -1.25,-0.63 1.25,0.63, height 1.1
SOIC8_INF-M [mm]
  rect 2.27x0.558 smd paste+0 mask+0: 1(-2.514,1.905) 2(-2.514,0.635) 3(-2.514,-0.635) 4(-2.514,-1.905) 5(2.514,-1.905) 6(2.514,-0.635) 7(2.514,0.635) 8(2.514,1.905)
  silkscreen extent -2.12,-2.63 2.12,2.63, body extent -3.1,-2.5 3.1,2.5, height 1.76
SOIC127P600X175-8N [mm]
  rect 1.525x0.65 smd: 1(-2.712,1.905) 2(-2.712,0.635) 3(-2.712,-0.635) 4(-2.712,-1.905) 5(2.712,-1.905) 6(2.712,-0.635) 7(2.712,0.635) 8(2.712,1.905)
  silkscreen extent -3.47,-2.45 1.6,2.58, body extent -3,-2.45 3,2.45, height 1.75
Sullins_SWR25X-NRTC-S06-ST-BA_MFG [mm]
  rect 1.55x1.55 hole 1 paste-1000 mask+0: 1(-6.35,0.3)
  round 1.55 hole 1 paste-1000 mask+0: 2(-3.81,0.3) 3(-1.27,0.3) 4(1.27,0.3) 5(3.81,0.3) 6(6.35,0.3)
  silkscreen extent -7.8,-3.67 7.8,3.05, body extent -7.9,-3.15 7.9,3.15, height 0.25
SW4_FSM-5P23_TEC [mil]
  rect 83x55 smd paste+0 mask+0: 1(-179,88) 2(179,88) 3(-179,-88) 4(179,-88)
  rect 90x90 hole 40: 1(-150,90) 2(150,90) 3(-150,-90) 4(150,-90)
  silkscreen extent -123,-123 123,123, body extent -152,-118 152,118, height 669
Test_Point#1 [mil]
  round 90 hole 30 unplated paste+4 mask+4: 1(0,0)
Test_Point#2 [mil]
  round 90 hole 30 unplated paste+4 mask+4: GG(0,0)
Test_Point#3 [mil]
  round 90 hole 30 unplated paste+4 mask+4: 1(13.7,-4.53)
Test_Point#4 [mil]
  round 90 hole 30 unplated paste+4 mask+4: 1(2.05,0)
Test_Point#5 [mil]
  round 90 hole 30 unplated paste+4 mask+4: 1(-1.38,-34.25)
Test_Point#6 [mil]
  round 90 hole 30 unplated paste+4 mask+4: 1(-11.46,3.23)
Test_Point#7 [mil]
  round 90 hole 30 unplated paste+4 mask+4: 1(-15.16,-10.59)
Test_Point#8 [mil]
  round 90 hole 39.37 unplated paste+4 mask+4: 1(-1.65,-1.73)
Test_Point#9 [mil]
  round 90 hole 39.37 unplated paste+4 mask+4: 1(0,-1.73)
Test_Point#10 [mil]
  round 90 hole 30 unplated paste+19.68 mask+4: 1(0,0)
Test_Point#11 [mil]
  round 90 hole 30 unplated paste+4 mask+4: 1(-12.8,0)
Test_Point#12 [mil]
  round 90 hole 27.56 unplated paste+4 mask+4: 1(-0.31,-10.59)
Test_Point#13 [mil]
  round 90 hole 30 unplated paste+4 mask+4: 1(-13.03,-3.43)
Test_Point#14 [mil]
  round 90 hole 30 unplated paste+4 mask+4: 1(13.54,-14.33)
Test_Point#15 [mil]
  round 90 hole 39.37 unplated paste+4 mask+4: 1(3.19,-1.73)
TO-220(bend2) [mil]
  round 180 hole 100: D(10,355)
  oval 70x90 hole 45: D(10,-440) G(-90,-440) S(110,-440)
  Top Layer region: -190,-300 210,-300 210,480 -190,480
  Bottom Layer region: -215,-310 240,-310 240,505 -215,505
  silkscreen extent -205,-305 225,495, body extent -185,-446 208,476, height 179
TO-220(bend_rad) [mil]
  oval 60x80 / inner oval 75x90 / far side oval 80x100 hole 40: 1(-85,-400) 2(15,-400) 3(115,-400)
  round 120 hole 60: 2(10,-185)
  body extent -285,-481 306,-50, height 994
"Type 3mm" [mm] "THT, LED-3mm, 2pin- Body 4.15mm(max)"
  round 1.6 hole 1: 1(1.27,0) 2(-1.27,0)
  silkscreen extent -1.66,-1.95 1.4,1.95, body extent -1.93,-1.94 1.87,1.94, height 10.5
Vishay_CRCW0805-e3_IPC_A [mil]
  rect 47.5x59.38 smd paste+0 mask+0: 1(-41.37,0) 2(41.37,0)
  silkscreen extent -3,-25 3,25, body extent -39,-25 39,25, height 20
Vishay_CRCW0805-e3_IPC_C [mil]
  rect 31.75x51.5 smd paste+0 mask+0: 1(-33.5,0) 2(33.5,0)
  silkscreen extent -3,-25 3,25, body extent -39,-25 39,25, height 20
WE-PD2_1054 [mm] "SMD Power Inductor, 2-Leads, body 10x9mm"
  rect 3.75x9.5 smd: 1(-3.125,0) 2(3.125,0)
  silkscreen extent -5.62,-0.13 -5.38,0.12, body extent -5.04,-4.5 5.04,4.5, height 5.43
Wurth_Electronics_0_MFG [mm]
  rect 1.1x1.2 smd paste+0 mask+0: 1(-1.05,0) 2(1.05,0)
  silkscreen extent -2.27,-0.67 0.13,0.67, body extent -1.7,-0.77 1.7,0.77, height 0.25
Yageo_RC0805_IPC_A [mm]
  rect 1.157x1.508 smd paste+0 mask+0: 1(-1.076,0) 2(1.076,0)
  silkscreen extent -0.12,-0.63 0.12,0.63, body extent -1,-0.62 1,0.63, height 0.6
Yageo_RC0805_IPC_C [mm]
  rect 0.757x1.308 smd paste+0 mask+0: 1(-0.876,0) 2(0.876,0)
  silkscreen extent -0.12,-0.63 0.12,0.63, body extent -1,-0.62 1,0.63, height 0.6